# Altium PCB AIR_SENSE_2.PcbDoc
Units mm, origin at the board's own origin, x right, y up, seen from the top; angles counter-clockwise.
Board outline 108 x 60 mm, 2 copper layers (Top Layer, Bottom Layer), stack 1.471 mm thick; 12 components, 12 nets, 91 pads, 0 vias.
Unrouted connection lines stored in the file: 25.
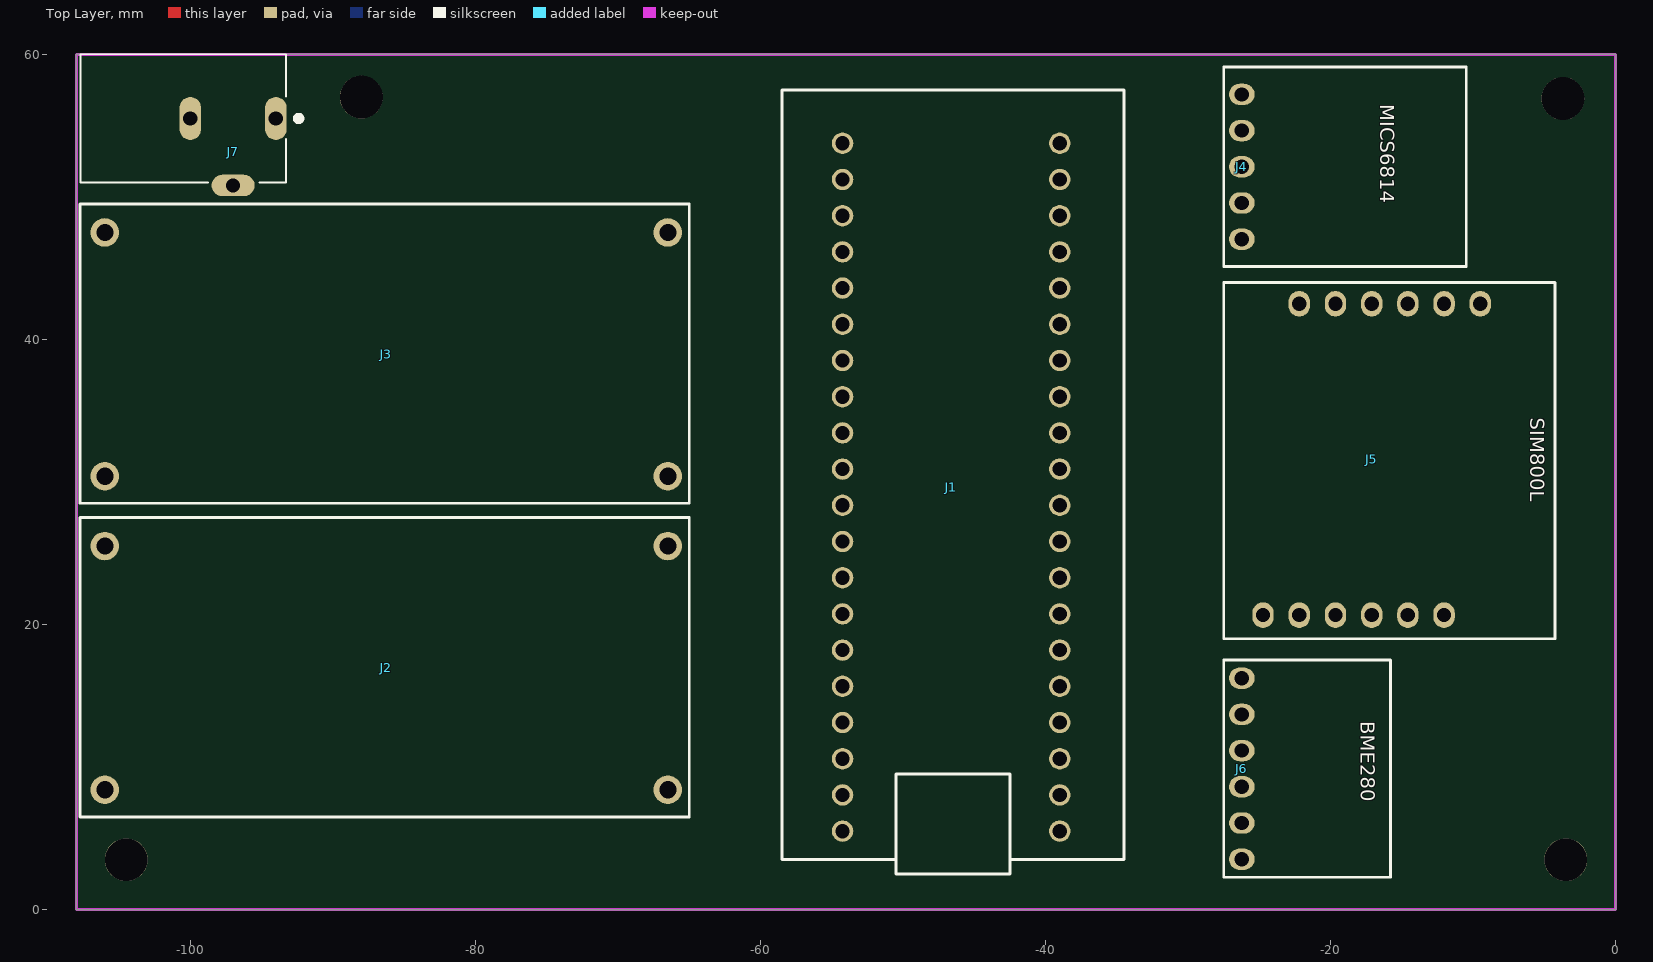
[diagram p0: Top Layer view]
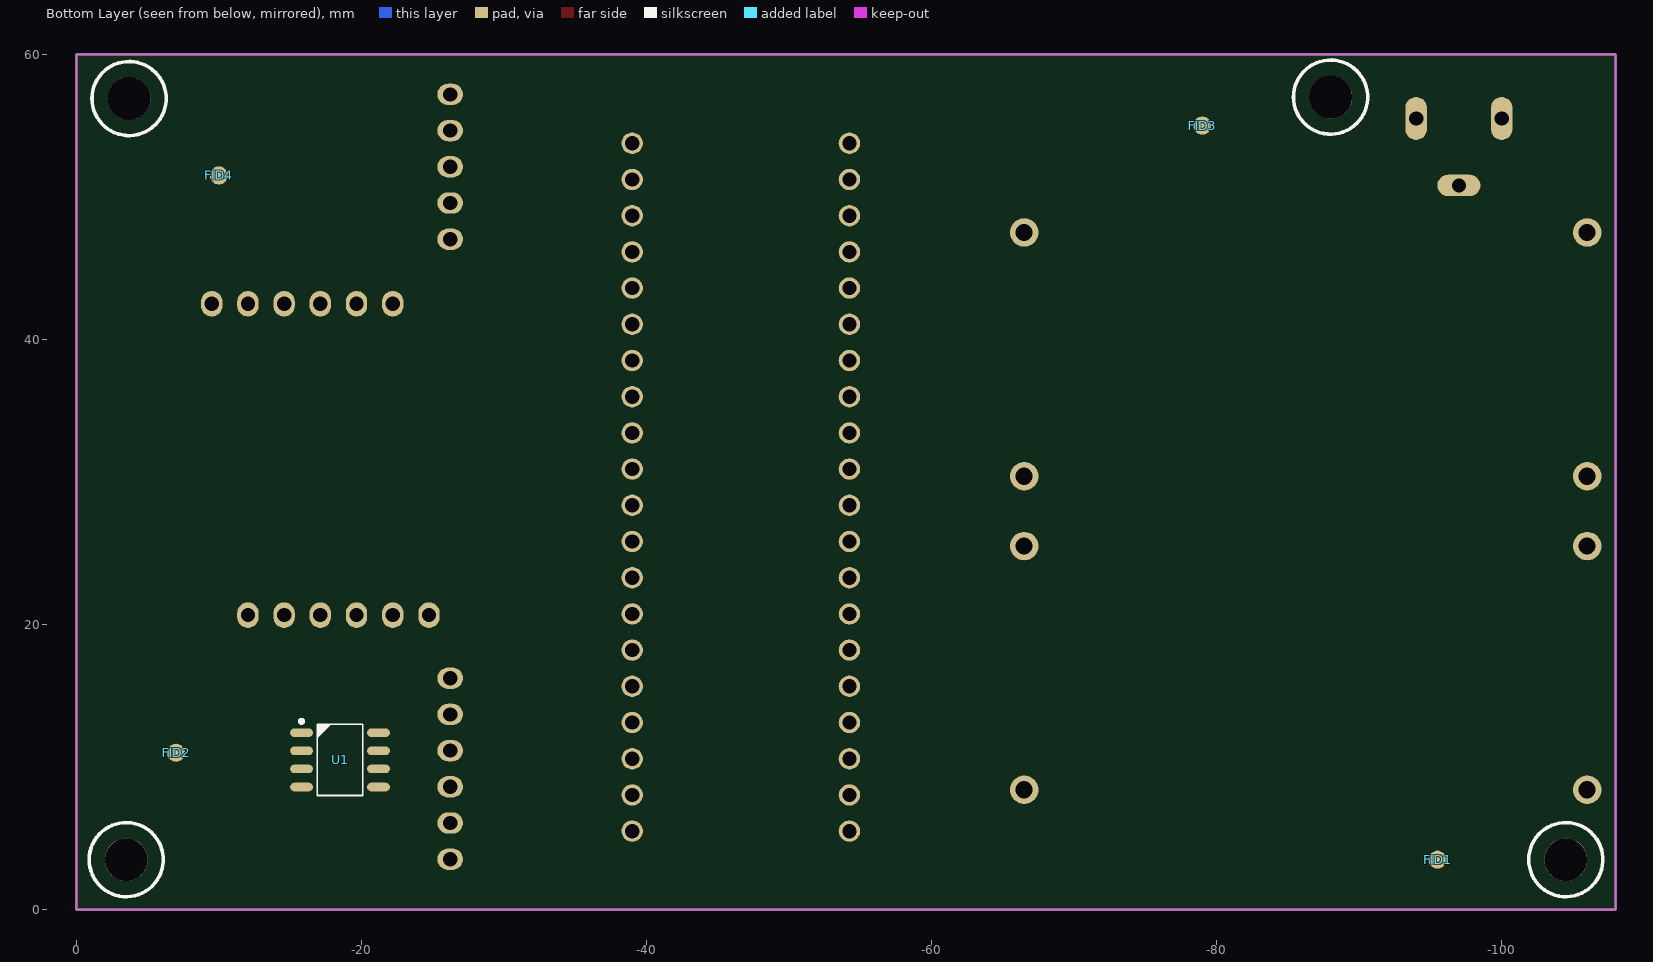
[diagram p1: Bottom Layer view, seen from below]

## Layer stack, top to bottom
Top Solder: solder mask 0.0102, Solder Resist, Dk 3.5
Top Layer: signal copper 0.0356
Dielectric1: dielectric 1.4, FR-4, Dk 4.8
Bottom Layer: signal copper 0.0356
Bottom Solder: solder mask 0.0102, Solder Resist, Dk 3.5

## Board outline
-108,0 0,0 0,60 -108,60

## Design rules (kind name [scope] priority, off if disabled: settings)
Clearance [All] p1: gap=0.254
PolygonConnect [All] p1: connectstyle=Relief reliefconductorwidth=0.254 reliefentries=4 polygonreliefangle="90 Angle" airgapwidth=0.254
RoutingVias [All] p1: holewidth=0.711 width=1.27 viastyle="Through Hole" minholewidth=0.711 minwidth=1.27 maxholewidth=0.711 maxwidth=1.27
SilkToSolderMaskClearance SilkscreenOverComponentPads [IsPad] p1: minsilkscreentomaskgap=0.254 clearancetoexposedcopper=TRUE
SolderMaskExpansion [All] p1: expansion=0.102
Width [All] p1: maxlimit=2 minlimit=0.254 preferedwidth=1
29 further rules are at their usual default settings.

## Classes and differential pairs
component class "[04] - MECANICO": FID1 FID2 FID3 FID4 PCB1
component class "[03] - CIRCUITO": * J1 J2 J3 J4 J5 J6 J7 M1 U1

## Components (designator, comment, footprint, x,y, rotation, side; value= is the part's Value field where it differs from the comment)
FID1 "FIDUCIAL" "FIDUCIAL - 1.27mm" -95.5,3.5 r90 bottom
FID2 "FIDUCIAL" "FIDUCIAL - 1.27mm" -7,11 r90 bottom
FID3 "FIDUCIAL" "FIDUCIAL - 1.27mm" -79,55 r90 bottom
FID4 "FIDUCIAL" "FIDUCIAL - 1.27mm" -10,51.5 r90 bottom
J1 "MODULE BLUE PILL SOCKET" "MODULE BLUE PILL SOCKET" -39,5.5 r90 top
J2 "XL6009" "MODULE DC-DC XL6009 SOCKET" -106,25.5 r0 top
J3 "XL6009" "MODULE DC-DC XL6009 SOCKET" -106,47.5 r0 top
J4 "MODULE MICS6814 SOCKET" "MODULE MICS6814 SOCKET" -27.5,61 r0 top
J5 "MODULE SIM800L SOCKET" "MODULE SIM800L SOCKET" -9.5,42.5 r270 top
J6 "Socket" "MODULE BME280 SOCKET" -27.5,17.5 r0 top
J7 "PJ-102BH" CUI_PJ-102BH -100.5,55.5 r180 top
U1 "Authentication Chip" SOIC127P600X175-8AN -18.5,10.5 r180 bottom

## Footprints (in the part's own frame and the unit in brackets; to place one, negate y for a bottom-side part, rotate by r counter-clockwise, add the part's x,y. Pads: shape width x height; smd on the part's side, far side on the other; paste and mask are expansions set on the pad)
CUI_PJ-102BH [mm]
  oval 1.508x3.016 hole 1: 1(-6.5,0) 2(-0.5,0)
  oval 3.016x1.508 hole 1: 3(-3.5,4.7)
  silkscreen extent -8.3,-4.5 7.2,4.5, body extent -7.2,-4.5 7.2,4.9, height 11.5
"FIDUCIAL - 1.27mm" [mm]
  round 1.27 smd: Fiducial(0,0)
"MODULE BLUE PILL SOCKET" [mm]
  round 1.5 hole 1: 1(0,0) 2(2.54,0) 3(5.08,0) 4(7.62,0) 5(10.16,0) 6(12.7,0) 7(15.24,0) 8(17.78,0) 9(20.32,0) 10(22.86,0) 11(25.4,0) 12(27.94,0) 13(30.48,0) 14(33.02,0) 15(35.56,0) 16(38.1,0) 17(40.64,0) 18(43.18,0) 19(45.72,0) 20(48.26,0) 21(48.26,15.24) 22(45.72,15.24) 23(43.18,15.24) 24(40.64,15.24) 25(38.1,15.24) 26(35.56,15.24) 27(33.02,15.24) 28(30.48,15.24) 29(27.94,15.24) 30(25.4,15.24) 31(22.86,15.24) 32(20.32,15.24) 33(17.78,15.24) 34(15.24,15.24) 35(12.7,15.24) 36(10.16,15.24) 37(7.62,15.24) 38(5.08,15.24) 39(2.54,15.24) 40(0,15.24)
  silkscreen extent -3,-4.5 52,19.5, body extent -3.43,-3.81 54.13,19.05, height 20.77
"MODULE BME280 SOCKET" [mm]
  oval 1.8x1.5 hole 1: 1(1.27,-1.27) 2(1.27,-3.81) 3(1.27,-6.35) 4(1.27,-8.89) 5(1.27,-11.43) 6(1.27,-13.97)
  silkscreen extent 0,-15.24 11.7,0, body extent 0,-15.42 11.5,0.12, height 14.1
"MODULE DC-DC XL6009 SOCKET" [mm]
  round 2 hole 1.2: 1(0,0) 2(0,-17.1) 3(39.5,-17.1) 4(39.5,0)
  silkscreen extent -1.75,-19 41,2, body extent -1.81,-19.11 41.37,1.97, height 21.25
"MODULE MICS6814 SOCKET" [mm] "GAS SENSOR BREAKOUT BOARD"
  oval 1.8x1.5 hole 1: 1(1.27,-13.97) 2(1.27,-11.43) 3(1.27,-8.89) 4(1.27,-6.35) 5(1.27,-3.81)
  silkscreen extent 0,-15.89 17.02,-1.89, body extent 0.02,-15.89 17.02,-1.89, height 14.1
"MODULE SIM800L SOCKET" [mm] "GSM GRPS MODULE BREAKOUT BOARD"
  oval 1.8x1.5 hole 1: 1(0,0) 2(0,-2.54) 3(0,-5.08) 4(0,-7.62) 5(0,-10.16) 6(0,-12.7) 7(21.844,-15.24) 8(21.844,-12.7) 9(21.844,-10.16) 10(21.844,-7.62) 11(21.844,-5.08) 12(21.844,-2.54)
  silkscreen extent -1.5,-18 23.5,5.25, body extent -1.51,-17.94 23.49,5.19, height 15.6
SOIC127P600X175-8AN [mm]
  round 1 on Mech15: 0(0,0)
  oval 1.6x0.6 smd: 1(-2.7,1.905) 2(-2.7,0.635) 3(-2.7,-0.635) 4(-2.7,-1.905) 5(2.7,-1.905) 6(2.7,-0.635) 7(2.7,0.635) 8(2.7,1.905)
  silkscreen extent -2.83,-2.5 1.6,2.82, body extent -3,-2.45 3,2.45, height 1.75

## Part data
J2 J3: library part "MODULE DC-DC XL6009 SOCKET"
J6: library part "MODULE BME280 SOCKET", "CONN HEADER FEMALE 6POS .1\" GOLD"
J7: "CONN PWR JACK 2.5X5.5MM SOLDER"
U1: library part ATECC608, "Authentication Chip IC Networking and Communications 8-SOIC"

## Free pads (board coordinates)
  round 3 hole 3: 1(-104.5,3.5) 1(-88,57) 1(-3.7,56.9) 1(-3.5,3.5)

## Nets (pads, with @x,y where several pads share a name; then routed paths per layer and width w, separated by ;. In a path a pad name is that pad's centre, name@x,y a point inside that pad or via, vN(x,y) a via of type N, cw(c..) or ccw(c..) an arc to the next point about the centre after c; other vN are vias at no path point)
CSB: J6.2
GND: J1.19 J1.39 J1.40 J2.2 J2.3 J3.2 J3.3 J4.4 J5.6 J6.5 J7.1 U1.4
I2C_SCL: J1.16 J6.4 U1.6
I2C_SDA: J1.17 J6.3 U1.5
SDO: J6.1
SIM800_RST: J5.3
SIM800_RXD: J1.14 J5.4
SIM800_TXD: J1.15 J5.5
VCC3V3: J1.20 J6.6 U1.8
VCC4V0: J2.4 J5.2
VCC5V0: J1.18 J3.4 J4.5
VIN: J2.1 J3.1 J7.2 J7.3
pads on no net: FID1.Fiducial FID2.Fiducial FID3.Fiducial FID4.Fiducial J1.1 J1.2 J1.3 J1.4 J1.5 J1.6 J1.7 J1.8 J1.9 J1.10 J1.11 J1.12 J1.13 J1.21 J1.22 J1.23 J1.24 J1.25 J1.26 J1.27 J1.28 J1.29 J1.30 J1.31 J1.32 J1.33 J1.34 J1.35 J1.36 J1.37 J1.38 J4.1 J4.2 J4.3 J5.1 J5.7 J5.8 J5.9 J5.10 J5.11 J5.12 U1.0 U1.1 U1.2 U1.3 U1.7

## Keep-outs
Keep-Out Layer:
  the board outline again, w0.2

## Silkscreen, mask and mechanical layers (free items; w line width, h text height)
Bottom Overlay:
  circle w0.254: c-104.5,3.5 r2.6
  circle w0.254: c-3.7,56.9 r2.6
  circle w0.254: c-88,57 r2.6
  circle w0.254: c-3.5,3.5 r2.6
Mechanical 1:
  lines w0.254: -0.254,62 0.254,62 ; 0,61.746 0,62.254
  text "0,62 (mm)" at 0.254,62 h1.52

## Text inside footprints (layer, text, board x,y; h text height)
J4: Top Overlay "MICS6814" at -16.5,56.5 h1 r270
J5: Top Overlay "SIM800L" at -6,34.5 h1 r270
J6: Top Overlay "BME280" at -17.9,13.2 h1 r270